# Altium PCB Debug Probe Adaptor.PcbDoc
Units mm, origin at the board's own origin, x right, y up, seen from the top; angles counter-clockwise.
Board outline 15.11 x 8.64 mm, 2 copper layers (Top Layer, Bottom Layer); 3 components, 6 nets, 20 pads, 2 vias.
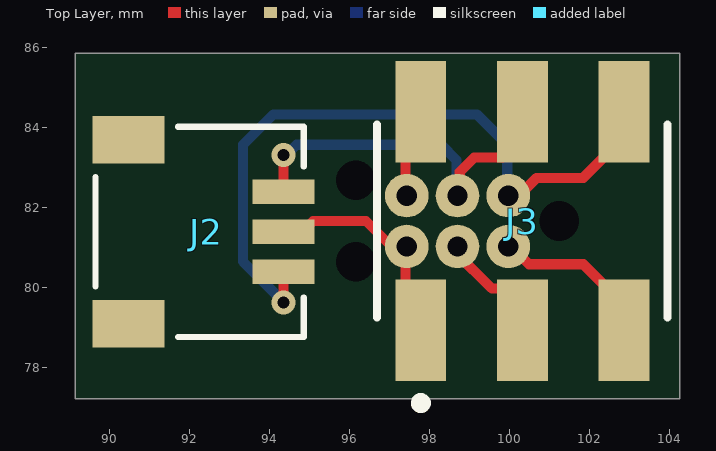
[diagram p0: Top Layer view]
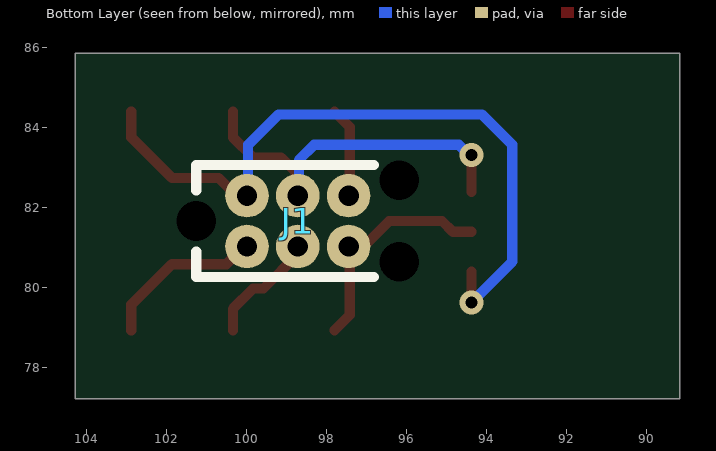
[diagram p1: Bottom Layer view, seen from below]

## Layer stack, top to bottom
Top Solder: solder mask 0.0102, Solder Resist, Dk 3.5
Top Layer: signal copper 0.0356
Dielectric 1: dielectric 0.32, FR-4, Dk 4.8
Bottom Layer: signal copper 0.0356
Bottom Solder: solder mask 0.0102, Solder Resist, Dk 3.5

## Board outline
89.154,77.216 89.154,85.852 104.267,85.852 104.267,77.216

## Design rules (kind name [scope] priority, off if disabled: settings)
Clearance [All] p1: gap=0.254 ignorepadtopadclearanceinfootprint=FALSE
PolygonConnect [All] p1: connectstyle=Relief reliefconductorwidth=0.254 reliefentries=4 polygonreliefangle="90 Angle" airgapwidth=0.254
RoutingVias [All] p1: holewidth=0.711 width=1.27 viastyle="Through Hole" minholewidth=0.711 minwidth=1.27 maxholewidth=0.711 maxwidth=1.27
SolderMaskExpansion [All] p1: expansion=0 istentingtop=FALSE
SupplyNets "Schematic Supply Nets_1" [InNet('3V3')] p1: voltage=0.000
SupplyNets "Schematic Supply Nets" [InNet('GND')] p2: voltage=0.000
Width [All] p1: maxlimit=0.254 minlimit=0.254 preferedwidth=0.254
30 further rules are at their usual default settings.

## Components (designator, comment, footprint, x,y, rotation, side; value= is the part's Value field where it differs from the comment)
J1 "prog-connector-male" "Copy of prog-connector-Footprint-1" 99.977,81.026 r180 bottom
J2 "SM03B-SRSS-TB" CONN_SM03B-SRSS-TB_JST 92.261,81.391 r270 top
J3 "95278-101A06LF" AMPM-95278-101A06LF_V 100.33,81.661 r0 top

## Footprints (in the part's own frame and the unit in brackets; to place one, negate y for a bottom-side part, rotate by r counter-clockwise, add the part's x,y. Pads: shape width x height; smd on the part's side, far side on the other; paste and mask are expansions set on the pad)
AMPM-95278-101A06LF_V [mm] "SMD, 6-Leads, Body 7.26x4.83mm, Pitch 2.54mm"
  rect 1.27x2.54 smd: 1(-2.54,-2.73) 2(-2.54,2.73) 3(0,-2.73) 4(0,2.73) 5(2.54,-2.73) 6(2.54,2.73)
  silkscreen extent -3.63,-4.67 3.63,2.41, body extent -3.61,-3.64 3.61,3.64, height 9.71
CONN_SM03B-SRSS-TB_JST [mil]
  rect 24x61 smd paste+0 mask+0: 1(-39.37,82.68) 2(0,82.68) 3(39.37,82.68)
  rect 47x71 smd paste+0 mask+0: 4(-90.55,-69.88) 5(90.55,-69.88)
  silkscreen extent -103,-102 103,102
"Copy of prog-connector-Footprint-1" [mm]
  round 1.09 hole 0.508 paste-2539.97 mask+0: 1(0,0) 2(0,1.27) 3(1.27,0) 4(1.27,1.27) 5(2.54,0) 6(2.54,1.27)
  round 0 hole 0.991 unplated: 13(-1.27,0.635) 13(3.81,-0.381) 13(3.81,1.651)
  silkscreen extent -1.27,-0.76 3.18,2.03, body extent -0.55,-0.54 3.09,1.81, height 7.35

## Part data
J1: library part CMP-002-00078-1, "Custom TC2030-NL based connector for programming"
J2: library part CMP-408-000000-1, "No Description Available", Manufacturer_Name=JST, Copyright="Copyright (C) 2026 Ultra Librarian. All rights reserved.", Design Item ID=SM03B-SRSS-TB, Manufacturer_Part_Number=SM03B-SRSS-TB, RefDes=RefDes, Source=SM03B-SRSS-TB.SchLib, Type=Type
J3: library part CMP-002-00024-2, "Male Header, Pitch 2.54 mm, 2 x 3 Position, Height 14.4 mm, RoHS, Tape and Reel", Manufacturer=Amphenol, Package Description="Male Header, Pitch 2.54 mm, 2 x 3 Position, Height 14.4 mm", Case/Package=95278-101A06LF, Connector Type=Header, Datasheet URL=http://portal.fciconnect.com/Comergent//fci/drawing/95278.pdf, Datasheet Version="Rev. AC, 03/2016", Gender=Male, Mounting Technology=SM, Package Reference=95278-101A06LF, RoHS Compliant=Unknown

## Via types
v1: diameter 0.6, hole 0.3, Top Layer to Bottom Layer, 2 vias

## Nets (pads, with @x,y where several pads share a name; then routed paths per layer and width w, separated by ;. In a path a pad name is that pad's centre, name@x,y a point inside that pad or via, vN(x,y) a via of type N, cw(c..) or ccw(c..) an arc to the next point about the centre after c; other vN are vias at no path point)
3V3: J1.1 J3.5 | length 4.1
  Top Layer w0.254: J1.1@99.949,80.899 100.175,80.899 100.492,80.582 101.854,80.582 102.87,79.566 J3.5
GND: J1.5 J2.2 J3.1 | length 5.6
  Top Layer w0.254: J2.2 94.831,81.391 95.101,81.661 96.421,81.661 97.183,80.899 97.409,80.899 97.409,79.312 J3.1
nRESET: J1.3 J3.3 | length 2.8
  Top Layer w0.254: J1.3@98.679,80.899 98.679,80.859 99.565,79.973 99.822,79.973 100.33,79.465 J3.3
SWDCLK: J1.4 J2.1 J3.4 | length 9.8
  Top Layer w0.254: J2.1 v1(94.361,83.312) ; J1.4@98.679,82.169 98.762,82.252 98.762,82.887 99.123,83.248 99.822,83.248 100.33,83.756 J3.4
  Bottom Layer w0.254: v1(94.361,83.312) 94.429,83.312 94.683,83.566 98.298,83.566 98.679,83.185 J1.4@98.679,82.169
SWDIO: J1.2 J2.3 J3.6 | length 18
  Top Layer w0.254: v1(94.361,79.629) J2.3 ; J1.2@99.949,82.169 100.117,82.169 100.688,82.74 101.854,82.74 102.87,83.756 J3.6
  Bottom Layer w0.254: v1(94.361,79.629) 93.345,80.645 93.345,83.566 94.107,84.328 99.187,84.328 99.949,83.566 J1.2@99.949,82.169
SWO: J1.6 J3.2 | length 2.4
  Top Layer w0.254: J1.6@97.409,82.169 97.409,84.01 J3.2
pads on no net: J1.13 J2.4 J2.5

## Silkscreen, mask and mechanical layers (free items; w line width, h text height)
Mechanical 1:
  the board outline again, w0.05